# Altium PCB PS-25-001-E-01.PcbDoc (part 2 of 3)
Units mm, origin at the board's own origin, x right, y up, seen from the top; angles counter-clockwise.
Board outline 120 x 60 mm, 4 copper layers (01_Top, 02_Plane, 03_Plane, 04_Bottom), stack 1.578 mm thick; 526 components, 249 nets, 1738 pads, 748 vias.
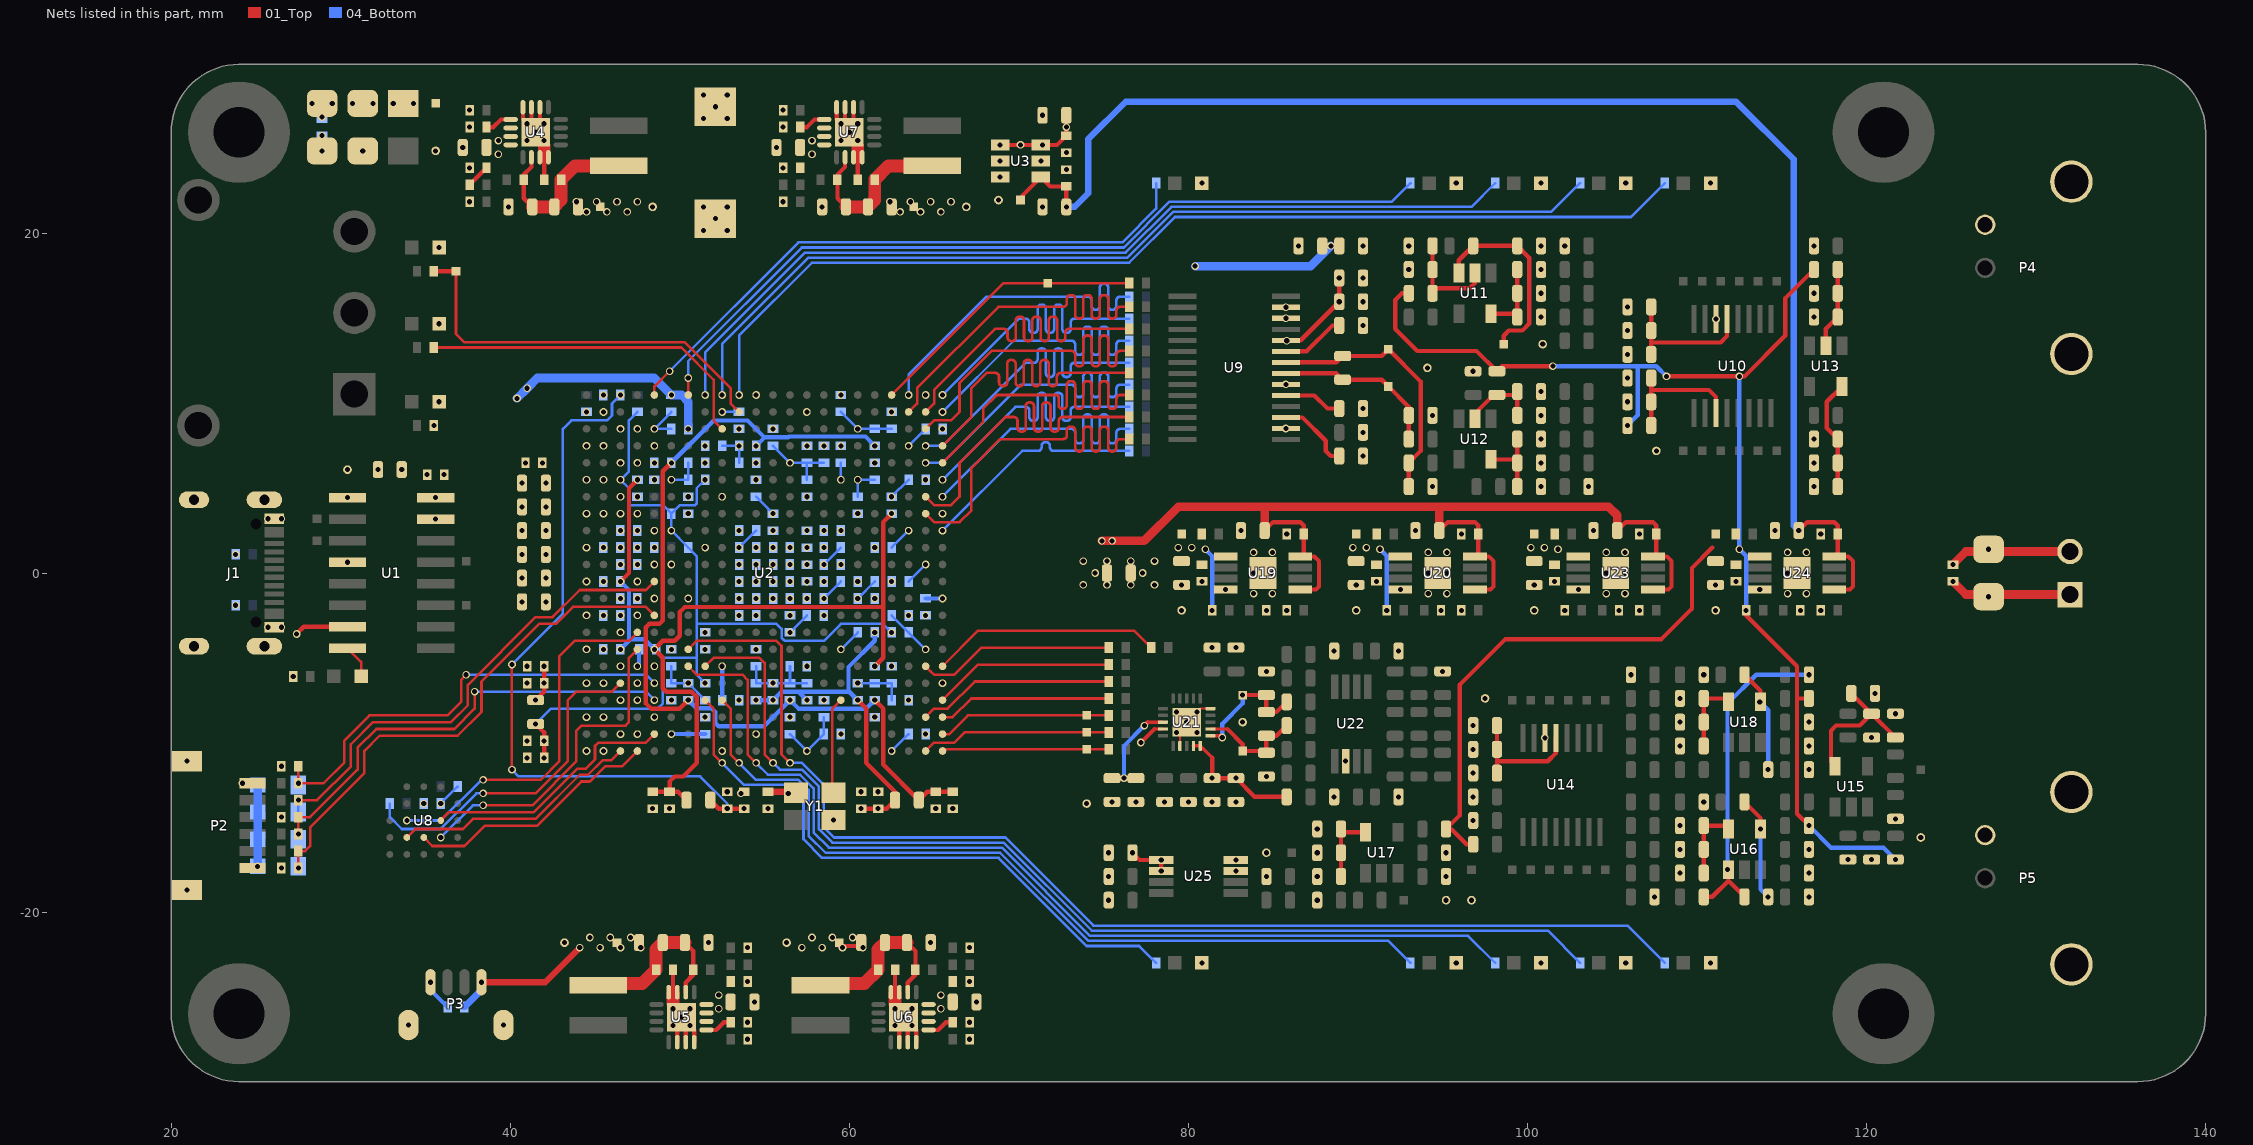
[diagram p4: the nets of this part, all layers, seen from the top]

## Part data
C1 C2 C3 C4 C5 C6 C7 C12 C13 C14 C15 C17 C35 C40 C45 C48 C49 C60 C62 C65 C67 C68 C80 C83 C85 C87 C88 C97 C100 C107 C110 C111 C113 C115 C121 C122 C123 C124 C125 C126 C127 C129 C130 C131 C132 C133 C134 C135 C136 C137 C138 C139 C140 C141 C142 C143 C144 C145 C146 C147 C148 C149 C150 C151 C152 C153 C154 C155 C156 C157 C158 C159 C160 C161 C162 C163 C164 C165 C166 C167 C168 C169 C170 C171 C172 C173 C174 C175 C176 C177 C178 C179 C180 C181 C182 C183 C184 C185 C186 C187 C188 C189 C190 C191 C192 C193 C194 C195 C196 C197 C198 C199 C200 C201 C202 C203 C204 C205 C206 C207 C208 C209 C210 C211 C212 C213 C214 C215 C216 C217 C218 C219 C220 C221 C222 C223 C224 C225 C226 C227 C228 C229 C230 C231 C232 C233 C234 C235: library part Cap, "Capacitor"
C8 C9 C10 C11 C16 C18 C19 C20 C21 C22 C23 C24 C25 C26 C27 C28 C29 C30 C31 C32 C33 C34 C36 C37 C38 C39 C41 C42 C43 C44 C46 C47 C50 C51 C52 C53 C54 C55 C56 C57 C58 C59 C61 C63 C64 C66 C69 C70 C71 C72 C73 C74 C75 C76 C77 C78 C79 C81 C82 C84 C86 C89 C90 C91 C92 C93 C94 C95 C96 C98 C99 C101 C102 C103 C104 C105 C106 C108 C109 C112 C114 C116 C117 C118 C119 C128: library part Cap_S, "Capacitor"
C120: library part "Cap Pol2", "Polarized Capacitor (Axial)"
D1 D2 D3 D4 D5 D6 D7 D8 D9 D10 D11 D12 D13 D14: library part LED0_S, "Typical INFRARED GaAs LED"
D15 D16 D17 D18: library part "D Zener_S", "Zener Diode"
F1: library part "Fuse 2_S", "Fuse"
FB1 FB2 FB3: library part Inductor, "Inductor"
J1: library part USBTypeC
L1 L2 L3 L4: library part Inductor_S, "Inductor"
P1: "Header, 2-Pin"
P2: library part 6PinConWith2Boss
P3: library part CON_4P_BOSS
P4 P5: library part BNC_TE, "BNC Elbow Connector"
R1 R2 R3 R4 R5 R6 R7 R8 R9 R10 R11 R12 R13 R14 R15 R16 R17 R18 R19 R20 R21 R22 R23 R24 R25 R26 R27 R28 R29 R30 R31 R32 R33 R34 R35 R36 R37 R38 R39 R40 R41 R42 R43 R44 R45 R46 R47 R49 R50 R55 R56 R57 R58 R59 R60 R61 R62 R63 R64 R65 R66 R67 R68 R69 R70 R71 R72 R73 R74 R75 R76 R77 R78 R79 R80 R81 R82 R83 R84 R85 R86 R87 R88 R89 R90 R91 R92 R93 R94 R95 R96 R97 R98 R99 R100 R101 R102 R103 R104 R105 R106 R107 R108 R109 R110 R111 R112 R113 R114 R115 R116 R117 R118 R119 R120 R121 R122 R123 R124 R125 R126 R127 R128 R129 R130 R131 R132 R133 R134 R135 R136 R137 R138 R139 R140 R141 R142 R143 R144 R145 R146 R147 R148 R149 R150 R151 R152 R153 R154 R155 R156 R157 R158 R159 R160 R161 R162 R163 R164: library part Res1, "Resistor"
S1: library part SW-SPDT, "SPDT Subminiature Toggle Switch, Right Angle Mounting, Vertical Actuation"
U2: library part 5CEFA7F23, "Cyclone V E Family FPGA, 1.07 to 1.13 V Supply, 240 I/O Pins, 7 PLLs, 484-Pin FBGA, Speed Grade 7, Commercial Grade, RoHS Compliant"
U3: library part LM2776
U4 U5 U6 U7: library part TLV62130RGT_S
U8: library part MT25QL128ABA8E12
U11 U12 U13 U15 U16 U17 U18: library part LM7321MF, "Op Amp"
U21: library part ADS127L21
U22: library part THS4551
U25: library part REF60xx
Y1: library part XTAL_ACTIVE

## Free pads (board coordinates)
  round 6 hole 3: 0(121,26) 2(121,-26) 3(24,-26) 4(24,26)

## Via types
v1: diameter 0.45, hole 0.3, 01_Top to 04_Bottom, tented both sides, 728 vias
v2: diameter 0.4, hole 0.3, 01_Top to 04_Bottom, tented bottom, 20 vias

## Nets (pads, with @x,y where several pads share a name; then routed paths per layer and width w, separated by ;. In a path a pad name is that pad's centre, name@x,y a point inside that pad or via, vN(x,y) a via of type N, cw(c..) or ccw(c..) an arc to the next point about the centre after c; other vN are vias at no path point)
1V1: C9.2 C11.2 C18.2 C20.2 C22.2 C24.2 C25.2 C26.2 C28.2 C30.2 C32.2 C34.2 C37.2 C39.2 C41.2 C42.2 C44.2 C47.2 C51.2 C52.2 C53.2 C55.2 C56.2 C57.2 C58.2 C59.2 C120.1 C121.2 C122.1 C123.1 C124.1 C125.1 C126.1 C127.1 R4.1 TP8.1 U2.J4 U2.J10 U2.J12 U2.J14 U2.J16 U2.K3 U2.K5 U2.K11 U2.K13 U2.K15 U2.L4 U2.L10 U2.L12 U2.L14 U2.L16 U2.M11 U2.M13 U2.M15 U2.N4 U2.N10 U2.N12 U2.N14 U2.P3 U2.P11 U2.P13 U2.P15
  other v1: 46.5,-2.5 54.5,-2.5 56.5,-2.5 58.5,-2.5 42.1,-1.7 47.5,-1.5 53.5,-1.5 55.5,-1.5 57.5,-1.5 54.5,-0.5 56.5,-0.5 58.5,-0.5 42.1,-0.3 47.5,0.5 53.5,0.5 55.5,0.5 57.5,0.5 59.5,0.5 42.1,1.1 46.5,1.5 48.5,1.5 54.5,1.5 56.5,1.5 58.5,1.5 42.1,2.5 47.5,2.5 53.5,2.5 55.5,2.5 57.5,2.5 59.5,2.5 42.1,3.9 42.1,5.3 41.9,6.5 51.4,20.2 52.8,20.2 52.1,20.9 44.5,21.3 45.7,21.3 46.9,21.3 51.4,21.6 52.8,21.6 43.9,21.9 45.1,21.9 46.3,21.9 47.5,21.9
1V8: C66.2 C69.2 C70.2 C71.2 C75.2 C77.2 C78.2 C79.2 C81.2 C82.2 C113.2 C128.1 C215.1 C216.1 P3.1 R23.1 TP11.1 U2.AA16 U2.AA21 U2.R8 U2.T11 U2.U14 U2.U19 U2.W10 U2.W15 U2.W20 U2.Y13 U21.13 Y1.4 | length 16.4
  01_Top w0.203: 77.6,-8.8 U21.13@78.5,-8.8
  01_Top w0.254: C216.1@75.5,-12.1 C215.1@76.9,-12.1 ; v1(77.4,-9) 77.6,-8.8
  01_Top w0.381: v1(38.3,-24.138) 42.063,-24.137 v1(44.1,-22.1) ; C128.1@55.2,-12.9 56.791,-12.9 Y1.4@56.86,-12.97
  04_Bottom w0.254: v1(76.2,-12.1) 76.2,-10.2 v1(77.4,-9)
  04_Bottom w0.381: C113.2@37.3,-25.6 38.3,-24.6 v1(38.3,-24.138)
  other v1: 45.3,-22.1 46.5,-22.1 47.7,-22.1 44.7,-21.5 45.9,-21.5 47.1,-21.5 56.4,-13 59.5,-9.5 64.5,-9.5 56.5,-8.5 53.5,-7.5 58.5,-7.5 63.5,-7.5 57.5,-5.5 62.5,-5.5 54.5,-4.5 51.5,-3.5
2V5: C54.2 C72.2 C73.2 C74.2 C76.2 C84.2 C86.2 C89.2 C90.2 C91.2 C92.2 C93.2 C129.1 C130.2 C133.1 C134.2 FB1.1 FB2.1 R32.1 TP13.1 U2.A3 U2.K18 U2.M17 U2.M19 U2.N18 U2.P20 U2.P21 U2.R18 U2.W11 U2.W12 U2.W14 U2.W17 | length 63.6
  01_Top w0.152: v1(40.1,-11.6) v1(40.1,-5.4)
  01_Top w0.254: FB1.1@51.8,-13.4 52.3,-13.9 v1(52.8,-13.9) v1(53.8,-13.9) ; TP13.1@59.4,-22 R32.1@60.7,-22 ; v1(60.5,-7.5) 61,-8 61,-11.2 62.7,-12.9 FB2.1@62.7,-13.4 62.2,-13.9 v1(61.7,-13.9) v1(60.7,-13.9)
  04_Bottom w0.152: v1(40.1,-11.6) 40.5,-12 51.2,-12 52.8,-13.6 v1(52.8,-13.9) ; v1(40.1,-5.4) 43.1,-2.4 43.1,8.5 43.6,9 45.7,9 46,9.3 46,10 v1(46.5,10.5)
  04_Bottom w0.254: v1(54.5,-7.5) v1(55.5,-7.5) 56,-7 57,-7 ; v1(57.5,-7.5) 57,-7 ; v1(60.5,-7.5) 60,-7 ; v1(61.5,-3.5) 61.5,-4 59.954,-5.546 59.954,-6.954 60,-7 ; 57,-7 60,-7
  other v1: 57.2,-22.1 58.4,-22.1 59.6,-22.1 60.8,-22.1 57.8,-21.5 59,-21.5 60.2,-21.5 63.5,-2.5 64.5,-2.5 61.5,-1.5 60.5,-0.5 62.5,-0.5 61.5,1.5
2V5_AUX: C27.2 C29.2 C31.2 C33.2 C36.2 C38.2 C135.1 C136.2 FB2.2 U2.D11 U2.D18 U2.E6 U2.W7 U2.W13 U2.W18 | length 54.7
  01_Top w0.254: v1(49.5,6.5) 49,6 49,-2.8 48.8,-3 48.2,-3 48,-3.2 48,-7.7 48.3,-8 50,-8 v1(50.5,-7.5) ; v1(61.5,-7.5) 62,-8 62,-11.3 FB2.2@64.1,-13.4 64.6,-12.9 C136.2@65.1,-12.9 C135.1@66.1,-12.9
  04_Bottom w0.254: v1(49.5,6.5) 52,9 54,9 55,8 ; v1(50.5,-7.5) 50.979,-7.979 51.879,-7.979 52.1,-8.2 52.1,-8.846 52.3,-9.046 54.954,-9.046 v1(56.5,-7.5) 57,-8 61,-8 v1(61.5,-7.5) ; v1(54.5,7.5) 55,8 ; v1(61.5,7.5) 60.954,8.046 56.446,8.046 56.4,8 55,8
2V5_FPLL: C8.2 C10.2 C16.2 C19.2 C21.2 C23.2 C131.1 C132.2 FB1.2 U2.F4 U2.H19 U2.M3 U2.T3 U2.T5 U2.U18 | length 50.9
  01_Top w0.254: v1(46.5,-0.5) 47,0 47,5 v1(47.5,5.5) ; C132.2@48.4,-12.9 C131.1@49.4,-12.9 ; FB1.2@50.4,-13.4 49.9,-12.9 C131.1@49.4,-12.9 ; v1(61.5,-5.5) 62,-5 62,-2 ; v1(62.5,3.5) 62,3 62,-2 ; C131.1@49.4,-12.9 49.4,-12.3 49.7,-12 50.2,-12 51,-11.2 51,-7.3 50.7,-7 49.2,-7 49,-6.8 49,-5 v1(48.5,-4.5) 49,-4 49.7,-4 50,-3.7 50,-2.3 50.3,-2 62,-2
  04_Bottom w0.254: v1(46.5,-4.5) 47,-4 ; v1(46.5,-0.5) 47,-1 47,-4 ; v1(48.5,-4.5) 47.9,-3.9 47.1,-3.9 47,-4
3V3: C4.1 C5.2 C61.2 C63.2 C64.2 C94.2 C95.2 C96.2 C98.2 C99.2 C101.2 C102.2 C103.2 C104.2 C105.2 C106.2 C108.2 C109.2 C112.2 C114.2 C116.2 C117.2 C118.2 C119.2 C137.1 C138.2 C142.2 C144.1 FB3.1 R8.2 R13.2 R44.1 TP15.1 U1.4 U1.15 U1.16 U2.A6 U2.A16 U2.B19 U2.C7 U2.C10 U2.C12 U2.C22 U2.D8 U2.D14 U2.D15 U2.D16 U2.E8 U2.E11 U2.E18 U2.F11 U2.F21 U2.G7 U2.G14 U2.H17 U2.T6 U2.W6 U2.Y8 U9.27 | length 23.5
  01_Top w0.254: v1(41.5,-7.5) 42,-7 v1(42,-6.5) v1(42,-5.5)
  04_Bottom w0.508: v1(40.4,10.3) v1(41,10.9) 41.6,11.5 48.5,11.5 v1(49.5,10.5) 50.1,10.5 50.5,10.1 v1(50.5,8.5) ; v1(80.4,18.1) 87.2,18.1 v1(88.4,19.3)
  other v1: 51.5,-8.5 49.5,-7.5 27.2,-6.1 49.5,-4.5 30.4,0.635 35.6,3.175 60.5,3.5 35.6,4.445 50.5,4.5 57.5,4.5 54.5,5.5 64.5,5.5 35.1,5.8 33.6,6.1 51.5,6.5 54.5,6.5 61.5,6.5 51.5,7.5 57.5,7.5 58.5,7.5 59.5,7.5 53.5,8.5 55.5,8.5 65.5,8.5 35.5,8.7 62.5,9.5 59.5,10.5 85.75,15.675 63,21.3 64.2,21.3 65.4,21.3 62.4,21.9 63.6,21.9 64.8,21.9 66,21.9
3V3_PGM: C43.2 C46.2 C50.2 C115.2 C139.1 C140.2 FB3.2 P2.1 R36.2 R37.2 R38.2 R41.2 R43.2 R49.1 U2.F3 U2.F8 U2.J6 U2.R19 U2.V8 U8.B4 | length 52.1
  01_Top w0.254: v1(41.5,-8.9) 42,-9.4 v1(42,-9.9) v1(42,-10.9)
  04_Bottom w0.152: v1(35.9,-13.6) R49.1@36.9,-12.6 ; v1(41.5,-8.9) 42.4,-8 48.7,-8 49,-7.7 49,-5.1 49.1,-5 51,-5 ; R38.2@47.5,9.5 47,9 47,6 v1(46.5,5.5) 47,5 47,4.1 47.1,4 49,4 R37.2@49.5,3.5 ; v1(51.5,-6.5) 51,-6 51,-5 ; v1(51.5,5.5) 51,5 51,4.1 50.9,4 50,4 R37.2@49.5,3.5 ; v1(62.5,-3.5) 62,-3 59.5,-3 58.5,-4 56.2,-4 56.128,-3.928 56.109,-3.928 56.005,-3.824 56.005,-3.305 55.7,-3 51,-3 ; R37.2@49.5,3.5 v1(49.5,2.5) R36.2@50.5,1.5 51,1 51,-3 ; 51,-5 51,-3
  other v1: 26.5,-17.4 26.5,-14.4 24.2,-12.4
5V: C1.2 C2.2 C3.2 C6.2 C7.2 C12.1 C13.2 C35.1 C40.1 C60.1 C62.1 C80.1 C83.1 C97.1 C100.1 C194.1 C195.2 C198.1 C199.2 C219.1 C220.2 F1.2 P1.1 R3.1 R9.1 R19.1 R31.1 R42.1 TP71.1 U1.7 U3.3 U3.4 U4.10 U4.11 U4.12 U5.10 U5.11 U5.12 U6.10 U6.11 U6.12 U7.10 U7.11 U7.12 U19.5 U19.8 U20.5 U20.8 U23.5 U23.8 | length 77.4
  01_Top w0.254: v1(27.4,-3.6) 27.825,-3.175 U1.7@30.4,-3.175 ; R9.1@37.6,22.9 C35.1@38.6,23.9 ; v1(68.9,25.25) v1(70.1,25.25) U3.3@71.3,25.25 v1(71.4,25.25) 72.25,25.25 C13.2@72.8,25.8 v1(72.8,26.3) C12.1@72.8,27 ; C194.1@84.5,2.5 85,3 86.6,3 86.8,2.8 C195.2@86.8,2.3 86.8,1.175 U19.8@86.6,0.975 87.425,0.975 87.7,0.7 87.7,-0.8 87.525,-0.975 U19.5@86.6,-0.975 ; C198.1@94.8,2.5 95.3,3 96.9,3 97.1,2.8 97.1,1.175 U20.8@96.9,0.975 97.725,0.975 98,0.7 98,-0.8 97.825,-0.975 U20.5@96.9,-0.975 ; C219.1@105.3,2.5 105.8,3 107.4,3 107.6,2.8 107.6,1.175 U23.8@107.4,0.975 108.225,0.975 108.5,0.7 108.5,-0.8 108.325,-0.975 U23.5@107.4,-0.975
  01_Top w0.508: v1(74.9,1.9) v1(75.5,1.9) 77.4,1.9 79.4,3.9 84.5,3.9 ; C194.1@84.5,2.5 84.5,3.9 ; C198.1@94.8,2.5 94.8,3.9 ; C219.1@105.3,2.5 105.3,3.4 104.8,3.9 94.8,3.9 ; v1(125.1,-0.5) 125.87,-1.27 P1.1@132,-1.27 ; 84.5,3.9 94.8,3.9
  other v1: 54,-27.5 67.1,-27.5 52.3,-25.7 65.4,-25.7 52.3,-24.9 65.4,-24.9 127.2,-1.4 39.3,24.7 57.8,24.7 39.3,25.5 57.8,25.5 28.9,26.9 37.6,27.3 56.1,27.3 28.3,27.7 29.5,27.7 30.7,27.7 31.9,27.7 33.1,27.7 34.3,27.7
+A2V7: C221.2 C222.1 C227.2 R57.2 R60.1 R62.1 R63.1 R104.2 R106.1 R107.1 R108.1 R109.1 R154.2 TP61.1 U23.1
  other v1: 87.6,-17.9 109,-17.7 109,-10.2 96.8,-9 121.7,-8.3 102.2,-2.2 101.8,1.4 100.2,1.5 101,1.5 100.8,5.1 116.9,5.1 100.8,15.1 105.9,15.7
-5V: C14.2 C15.1 C223.1 C224.2 TP6.1 U3.1 U24.5 U24.8 | length 83.9
  01_Top w0.254: TP6.1@70.1,22 70.1,22.15 U3.1@71.3,23.35 71.85,22.8 C14.2@72.8,22.8 v1(72.8,21.6) ; v1(116,2.5) 116.5,3 118.1,3 118.3,2.8 C224.2@118.3,2.3 118.3,1.175 U24.8@118.1,0.975 118.925,0.975 119.2,0.7 119.2,-0.8 119.025,-0.975 U24.5@118.1,-0.975
  04_Bottom w0.381: v1(72.8,21.6) 73.3,21.6 74.1,22.4 74.1,25.6 76.3,27.8 112.3,27.8 115.7,24.4 115.7,2.8 v1(116,2.5)
-A2V7: C225.2 C226.1 C228.2 R66.2 R90.1 R93.1 R94.1 R110.2 R127.1 R129.1 R130.1 R132.1 R155.2 TP62.1 U24.1 | length 101.7
  01_Top w0.254: R90.1@93,16.5 92.6,16.5 92.2,16.1 92.2,14.4 93.5,13.1 97,13.1 R93.1@98.2,11.9 98.5,12.2 v1(101.5,12.2) ; R110.2@96.8,-16 96.4,-16 95.5,-15.1 R130.1@95.2,-15.1 96,-14.3 96,-6.6 98.7,-3.9 107.9,-3.9 109.7,-2.1 109.7,0.3 110.9,1.5 ; v1(108.2,11.6) v1(112.5,11.6) 112.8,11.6 115.2,14 115.2,16.2 R94.1@116.9,17.9 ; v1(112.9,-2.2) 112.9,-2.5 115.9,-5.5 115.9,-7.4 ; v1(116.6,-14.9) 115.9,-14.2 115.9,-7.4 ; R132.1@116.6,-7.4 115.9,-7.4
  04_Bottom w0.254: v1(101.5,12.2) 106.5,12.2 ; v1(105.9,8.7) 106.5,9.3 106.5,12.2 ; v1(108.2,11.6) 107.6,12.2 106.5,12.2 ; v1(112.5,11.6) v1(112.5,1.4) 112.9,1 v1(112.9,-2.2) ; v1(116.6,-14.9) 117.9,-16.2 121,-16.2 v1(121.7,-16.9)
A3V3: C141.1 C143.2 C148.1 C196.2 C197.1 C202.2 R140.2 TP54.1 U9.24 U19.1 | length 9.3
  01_Top w0.254: U9.24@85.75,13.725 86.625,13.725 v1(88.9,16) v1(88.9,17.4)
  04_Bottom w0.254: v1(81,1.4) 81.4,1 v1(81.4,-2.2)
  other v1: 79.4,1.5 80.2,1.5 90.3,9.7 85.8,13.7
A4V5: C200.2 C201.1 C203.2 C208.1 C209.1 C234.1 R134.1 R141.2 TP55.1 U20.1 U21.19 U21.20 U25.1 U25.2 | length 13.7
  01_Top w0.203: U21.19@80.3,-10.2 U21.20@80.7,-10.2 81.4,-10.9
  01_Top w0.254: v1(76.7,-16.5) 77.125,-16.925 v1(78.4,-16.925) v1(78.4,-17.575) ; 81.4,-10.9 v1(81.4,-12.1) v1(82.8,-12.1) 83.9,-13.2 R134.1@85.8,-13.2
  04_Bottom w0.254: v1(91.3,1.4) 91.7,1 v1(91.7,-2.2)
  other v1: 89.7,1.5 90.5,1.5
AD_CLK: R151.1 TP64.1 U2.AB21 | length 11.3
  01_Top w0.152: U2.AB21@64.5,-10.5 65,-10 66.2,-10 66.8,-9.4 TP64.1@74,-9.4 R151.1@75.3,-9.4
AD_CS: R160.1 U2.U21 | length 11.7
  01_Top w0.152: U2.U21@64.5,-5.5 64.8,-5.8 65,-6 66.2,-6 67.8,-4.4 R160.1@75.3,-4.4
AD_DRDY: R152.1 TP65.1 U2.AA22 | length 10.3
  01_Top w0.152: U2.AA22@65.5,-9.5 65.9,-9.5 67,-8.4 TP65.1@74,-8.4 R152.1@75.3,-8.4
AD_N: C207.2 C210.1 R145.2 TP57.1 U21.2 | length 6.6
  01_Top w0.203: U21.2@81.3,-9.2 82.3,-9.2
  01_Top w0.254: 82.3,-9.2 83.2,-10.1 TP57.1@83.2,-10.5 84.5,-10.5 C210.1@84.6,-10.6 C207.2@84.6,-9.6 85.2,-9.6 R145.2@85.8,-9
AD_P: C193.2 C207.1 R139.2 TP56.1 U21.1 | length 7.6
  01_Top w0.203: U21.1@81.3,-9.6 v1@81.9,-9.6
  01_Top w0.254: v1@81.9,-9.6 v1(82,-9.7) ; v1(83.2,-7.2) C193.2@84.6,-7.2 C207.1@84.6,-8.2 85.2,-8.2 R139.2@85.8,-7.6
  04_Bottom w0.254: v1(82,-9.7) 82,-8.9 83.2,-7.7 v1(83.2,-7.2)
AD_RST: R161.1 U2.U22 | length 13.6
  01_Top w0.152: U2.U22@65.5,-5.5 67.6,-3.4 76.8,-3.4 R161.1@77.8,-4.4
AD_SCLK: R156.1 U2.Y21 | length 11.7
  01_Top w0.152: U2.Y21@64.5,-8.5 65,-8 65.8,-8 67.4,-6.4 R156.1@75.3,-6.4
AD_SDI: R157.1 U2.W22 | length 10.7
  01_Top w0.152: U2.W22@65.5,-7.5 67.6,-5.4 R157.1@75.3,-5.4
AD_SDO: R153.1 U2.Y22 | length 10.3
  01_Top w0.152: U2.Y22@65.5,-8.5 66.1,-8.5 67.2,-7.4 R153.1@75.3,-7.4
AD_START: R150.1 TP63.1 U2.AB22 | length 9.8
  01_Top w0.152: U2.AB22@65.5,-10.5 65.6,-10.4 TP63.1@74,-10.4 R150.1@75.3,-10.4
AGND: C141.2 C143.1 C145.2 C146.2 C147.1 C149.2 C150.2 C151.1 C152.1 C153.1 C154.1 C155.2 C156.1 C157.2 C159.1 C160.1 C161.1 C162.2 C163.2 C164.2 C165.2 C168.2 C169.2 C170.1 C171.2 C172.2 C173.1 C174.2 C175.1 C176.1 C177.1 C178.2 C179.1 C180.1 C181.2 C182.1 C183.1 C184.1 C185.1 C186.2 C187.1 C188.2 C189.2 C190.2 C191.2 C192.2 C193.1 C194.2 C195.1 C196.1 C197.2 C198.2 C199.1 C200.1 C201.2 C208.2 C209.2 C210.2 C211.1 C212.1 C213.2 C214.2 C217.1 C218.1 C219.2 C220.1 C221.1 C222.2 C223.2 C224.1 C225.1 C226.2 C229.2 C230.2 C231.1 C232.1 C233.2 C234.2 C235.2 P4.2 P4.3 P4.4 P5.2 P5.3 P5.4 R77.2 R80.1 R86.2 R87.2 R88.2 R89.2 R98.2 R113.2 R121.2 R124.2 R125.2 R131.2 R135.1 R142.1 R143.1 R158.1 R159.1 R163.1 R164.1 TP34.1 TP35.1 TP36.1 TP51.1 TP52.1 TP53.1 TP58.1 TP59.1 TP60.1 TP67.1 TP68.1 TP70.1 TP73.1 U9.16 U9.20 U10.14 U14.14 U19.4 U19.9 U20.4 U20.9 U21.5 U21.17 U21.21 U22.6 U23.4 U23.9 U24.4 U24.9 U25.7 U25.8 | length 2.4
  01_Top w0.127: U21.17@79.5,-10.2 79.5,-9.2 v1(79.9,-8.8) ; v1(80.5,-8.2) 80.7,-8 U21.5@81.3,-8
  other v1: 75.3,-19.3 87.6,-19.3 95.2,-19.3 96.7,-19.3 107.5,-19.1 116.6,-19.1 75.3,-17.9 84.6,-17.9 95.2,-17.9 116.6,-17.7 82.8,-17.575 82.8,-16.925 118.9,-16.9 120.3,-16.9 75.3,-16.5 84.6,-16.5 87.6,-16.5 95.2,-16.5 109,-16.3 116.6,-16.3 123.2,-15.6 87.6,-15.1 109,-14.9 96.8,-14.6 121.7,-14.5 78.6,-13.5 80,-13.5 81.4,-13.5 82.8,-13.5 110.4,-13.5 88.6,-13.2 92.4,-13.2 96.8,-13.2 84.6,-12 96.8,-11.8 116.6,-11.6 89.275,-11.1 96.8,-10.4 116.6,-10.2 101.025,-9.725 120.3,-9.7 79.3,-9.4 80.5,-9.4 83.2,-8.8 109,-8.8 116.6,-8.8 79.3,-8.2 97.5,-7.4 109,-7.4 120.5,-7.1 106.1,-6 110.4,-6 84.6,-5.8 95,-5.8 88.6,-4.6 92.4,-4.6 81.4,-4.4 82.8,-4.4 79.6,-2.2 84.6,-2.2 85.8,-2.2 89.9,-2.2 94.9,-2.2 96.1,-2.2 100.4,-2.2 105.4,-2.2 106.6,-2.2 111.1,-2.2 116.1,-2.2 117.3,-2.2 83.85,-1.22 84.95,-1.22 94.15,-1.22 95.25,-1.22 104.65,-1.22 105.75,-1.22 115.35,-1.22 116.45,-1.22 82.2,-0.975 92.5,-0.975 103,-0.975 113.7,-0.975 76.6,-0.7 78,-0.7 79.6,-0.7 89.9,-0.7 100.4,-0.7 111.1,-0.7 80.8,-0.5 91.1,-0.5 101.6,-0.5 112.3,-0.5 77.3,0 83.85,0 84.95,0 94.15,0 95.25,0 104.65,0 105.75,0 115.35,0 116.45,0 76.6,0.7 78,0.7 83.85,1.22 84.95,1.22 94.15,1.22 95.25,1.22 104.65,1.22 105.75,1.22 115.35,1.22 116.45,1.22 85.8,2.3 96.1,2.3 106.6,2.3 117.3,2.3 83.1,2.5 93.4,2.5 103.9,2.5 114.6,2.5 94.4,5.1 103.6,5.1 100.8,6.5 116.9,6.5 90.3,6.9 107.6,7.2 100.8,7.9 116.9,7.9 90.3,8.3 85.75,8.525 94.4,9.3 100.8,9.3 105.9,10.1 100.8,10.7 85.75,11.125 105.9,11.5 96.8,11.9 94.1,12.1 105.9,12.9 100.9,13.5 105.9,14.3 90.3,14.6 111.125,14.975 116.9,15.1 90.3,16 100.8,16.5 116.9,16.5 90.3,17.4 93,17.9 100.8,17.9 93,19.3 100.8,19.3 102.2,19.3 116.9,19.3
AS_ASDO: U2.AB4 U8.D3 | length 15.1
  01_Top w0.152: U8.D3@34.9,-15.6 35.4,-16.1 37.3,-16.1 38.5,-14.9 41.6,-14.9 44.2,-12.3 44.7,-12.3 45.6,-11.4 46.6,-11.4 U2.AB4@47.5,-10.5
AS_DATA1: U2.AB3 U8.D2 | length 14.7
  01_Top w0.152: U8.D2@33.9,-15.6 34.4,-15.1 37.2,-15.1 37.8,-14.5 41.5,-14.5 44.1,-11.9 44.6,-11.9 45.45,-11.05 45.95,-11.05 U2.AB3@46.5,-10.5
AS_DATA2: U2.AA5 U8.C4 | length 15.2
  01_Top w0.152: U8.C4@35.9,-14.6 36.4,-14.1 38.23,-14.1 38.233,-14.103 41.397,-14.103 43.95,-11.55 44.45,-11.55 45,-11 45,-10.2 45.2,-10 48,-10 U2.AA5@48.5,-9.5
AS_DATA3: U2.T4 U8.D4 | length 19.5
  01_Top w0.152: v1(38.4,-13.7) 41.3,-13.7 43.9,-11.1 43.9,-9.3 44.2,-9 46.8,-9 47,-8.8 47,-5 U2.T4@47.5,-4.5
  04_Bottom w0.152: v1(35.9,-15.6) 37.8,-13.7 v1(38.4,-13.7)
AS_DCLK: R47.1 U2.V3 | length 20.4
  01_Top w0.152: v1(38.4,-13) 41.5,-13 43.4,-11.1 43.4,-7.5 43.9,-7 46,-7 U2.V3@46.5,-6.5
  04_Bottom w0.152: R47.1@32.9,-13.6 32.9,-14.4 33.6,-15.1 35.9,-15.1 38,-13 v1(38.4,-13)
AS_NCSO0: U2.R4 U8.C2 | length 21.8
  01_Top w0.152: v1(38.4,-12.2) 41.8,-12.2 42.9,-11.1 42.9,-4.9 43.8,-4 47,-4 U2.R4@47.5,-3.5
  04_Bottom w0.152: v1(33.9,-14.6) 35.9,-14.6 38.3,-12.2 v1(38.4,-12.2)
DA_CLK: R64.2 TP22.1 U2.A19 | length 16.7
  01_Top w0.152: U2.A19@62.5,10.5 69.1,17.1 75.3,17.1 R64.2@76.5,17.1
DA_D0: R65.2 U2.H21 | length 23.1
  01_Top w0.152: U2.H21@64.5,3.5 65,3 66.5,3 67.2,3.7 67.2,6.2 68.9,7.9 72.6,7.9 72.612,7.9 ccw(c72.612,8.119) 72.832,8.119 72.832,8.411 cw(c73.051,8.411) 73.051,8.631 73.1,8.631 cw(c73.1,8.411) 73.319,8.411 73.319,7.9 73.319,7.389 ccw(c73.538,7.389) 73.538,7.169 73.587,7.169 ccw(c73.587,7.389) 73.806,7.389 73.806,7.9 73.806,8.411 cw(c74.026,8.411) 74.026,8.631 74.075,8.631 cw(c74.075,8.411) 74.294,8.411 74.294,7.9 74.294,7.389 ccw(c74.513,7.389) 74.513,7.169 74.562,7.169 ccw(c74.562,7.389) 74.781,7.389 74.781,7.9 74.781,8.411 cw(c75.001,8.411) 75.001,8.631 75.049,8.631 cw(c75.049,8.411) 75.269,8.411 75.269,7.9 75.269,7.389 ccw(c75.488,7.389) 75.488,7.169 75.537,7.169 ccw(c75.537,7.389) 75.756,7.389 75.756,7.681 cw(c75.976,7.681) 75.976,7.9 76,7.9 R65.2@76.5,7.9
DA_D1: R67.2 U2.G22 | length 20
  04_Bottom w0.152: v1(65.5,4.5) 69.5,8.5 73,8.5 73.1,8.5 cw(c73.1,8.281) 73.319,8.281 73.319,7.869 ccw(c73.538,7.869) 73.538,7.649 73.587,7.649 ccw(c73.587,7.869) 73.806,7.869 73.806,8.5 73.806,9.131 cw(c74.026,9.131) 74.026,9.351 74.075,9.351 cw(c74.075,9.131) 74.294,9.131 74.294,8.5 74.294,7.869 ccw(c74.513,7.869) 74.513,7.649 74.562,7.649 ccw(c74.562,7.869) 74.781,7.869 74.781,8.5 74.781,9.131 cw(c75.001,9.131) 75.001,9.351 75.049,9.351 cw(c75.049,9.131) 75.269,9.131 75.269,8.5 75.269,7.869 ccw(c75.488,7.869) 75.488,7.649 75.537,7.649 ccw(c75.537,7.869) 75.756,7.869 75.756,8.281 cw(c75.976,8.281) 75.976,8.5 76,8.5 R67.2@76.5,8.5
DA_D2: R68.2 U2.G21 | length 23
  01_Top w0.152: U2.G21@64.5,4.5 65,4 66,4 66.5,4.5 66.5,6.5 69.2,9.2 69.432,9.2 69.7,9.2 cw(c69.7,8.981) 69.919,8.981 69.919,8.559 ccw(c70.138,8.559) 70.138,8.339 70.187,8.339 ccw(c70.187,8.559) 70.406,8.559 70.406,9.2 70.406,9.841 cw(c70.626,9.841) 70.626,10.061 70.675,10.061 cw(c70.675,9.841) 70.894,9.841 70.894,9.2 70.894,8.559 ccw(c71.113,8.559) 71.113,8.339 71.162,8.339 ccw(c71.162,8.559) 71.381,8.559 71.381,9.2 71.381,9.841 cw(c71.601,9.841) 71.601,10.061 71.649,10.061 cw(c71.649,9.841) 71.869,9.841 71.869,9.2 71.869,8.559 ccw(c72.088,8.559) 72.088,8.339 72.137,8.339 ccw(c72.137,8.559) 72.356,8.559 72.356,8.981 cw(c72.576,8.981) 72.576,9.2 72.6,9.2 R68.2@76.5,9.2
DA_D3: R70.2 U2.F22 | length 19.9
  04_Bottom w0.152: v1(65.5,5.5) 69.8,9.8 70.3,9.8 70.4,9.8 cw(c70.4,9.581) 70.619,9.581 70.619,9.199 ccw(c70.838,9.199) 70.838,8.979 70.887,8.979 ccw(c70.887,9.199) 71.106,9.199 71.106,9.8 71.106,10.401 cw(c71.326,10.401) 71.326,10.621 71.375,10.621 cw(c71.375,10.401) 71.594,10.401 71.594,9.8 71.594,9.199 ccw(c71.813,9.199) 71.813,8.979 71.862,8.979 ccw(c71.862,9.199) 72.081,9.199 72.081,9.8 72.081,10.401 cw(c72.301,10.401) 72.301,10.621 72.349,10.621 cw(c72.349,10.401) 72.569,10.401 72.569,9.8 72.569,9.199 ccw(c72.788,9.199) 72.788,8.979 72.837,8.979 ccw(c72.837,9.199) 73.056,9.199 73.056,9.581 cw(c73.276,9.581) 73.276,9.8 73.3,9.8 R70.2@76.5,9.8
DA_D4: R71.2 U2.E22 | length 23.1
  01_Top w0.152: U2.E22@65.5,6.5 67.9,8.9 67.9,9.7 68.7,10.5 72.2,10.5 cw(c72.2,10.356) 72.344,10.356 72.344,9.899 ccw(c72.563,9.899) 72.563,9.679 72.612,9.679 ccw(c72.612,9.899) 72.832,9.899 72.832,10.5 72.832,11.101 cw(c73.051,11.101) 73.051,11.321 73.1,11.321 cw(c73.1,11.101) 73.319,11.101 73.319,10.5 73.319,9.899 ccw(c73.538,9.899) 73.538,9.679 73.587,9.679 ccw(c73.587,9.899) 73.806,9.899 73.806,10.5 73.806,11.101 cw(c74.026,11.101) 74.026,11.321 74.075,11.321 cw(c74.075,11.101) 74.294,11.101 74.294,10.5 74.294,9.899 ccw(c74.513,9.899) 74.513,9.679 74.562,9.679 ccw(c74.562,9.899) 74.781,9.899 74.781,10.5 74.781,11.101 cw(c75.001,11.101) 75.001,11.321 75.049,11.321 cw(c75.049,11.101) 75.269,11.101 75.269,10.5 75.269,9.899 ccw(c75.488,9.899) 75.488,9.679 75.537,9.679 ccw(c75.537,9.899) 75.756,9.899 75.756,10.281 cw(c75.976,10.281) 75.976,10.5 76,10.5 R71.2@76.5,10.5
DA_D5: R75.2 U2.E21 | length 20
  04_Bottom w0.152: v1(64.5,6.5) 65.5,6.5 70.1,11.1 73,11.1 73.1,11.1 cw(c73.1,10.881) 73.319,10.881 73.319,10.599 ccw(c73.538,10.599) 73.538,10.379 73.587,10.379 ccw(c73.587,10.599) 73.806,10.599 73.806,11.1 73.806,11.601 cw(c74.026,11.601) 74.026,11.821 74.075,11.821 cw(c74.075,11.601) 74.294,11.601 74.294,11.1 74.294,10.599 ccw(c74.513,10.599) 74.513,10.379 74.562,10.379 ccw(c74.562,10.599) 74.781,10.599 74.781,11.1 74.781,11.601 cw(c75.001,11.601) 75.001,11.821 75.049,11.821 cw(c75.049,11.601) 75.269,11.601 75.269,11.1 75.269,10.599 ccw(c75.488,10.599) 75.488,10.379 75.537,10.379 ccw(c75.537,10.599) 75.756,10.599 75.756,10.881 cw(c75.976,10.881) 75.976,11.1 76,11.1 R75.2@76.5,11.1
DA_D6: R78.2 U2.D22 | length 23.1
  01_Top w0.152: U2.D22@65.5,7.5 67.2,9.2 67.2,10.9 68.1,11.8 68.344,11.8 68.612,11.8 cw(c68.612,11.581) 68.831,11.581 68.831,11.249 ccw(c69.051,11.249) 69.051,11.029 69.099,11.029 ccw(c69.099,11.249) 69.319,11.249 69.319,11.8 69.319,12.351 cw(c69.538,12.351) 69.538,12.571 69.587,12.571 cw(c69.587,12.351) 69.806,12.351 69.806,11.8 69.806,11.249 ccw(c70.025,11.249) 70.025,11.029 70.074,11.029 ccw(c70.074,11.249) 70.294,11.249 70.294,11.8 70.294,12.351 cw(c70.513,12.351) 70.513,12.571 70.562,12.571 cw(c70.562,12.351) 70.781,12.351 70.781,11.8 70.781,11.249 ccw(c71,11.249) 71,11.029 71.049,11.029 ccw(c71.049,11.249) 71.268,11.249 71.268,11.8 71.268,12.351 cw(c71.488,12.351) 71.488,12.571 71.537,12.571 cw(c71.537,12.351) 71.756,12.351 71.756,11.8 71.756,11.249 ccw(c71.975,11.249) 71.975,11.029 72.024,11.029 ccw(c72.024,11.249) 72.243,11.249 72.243,11.581 cw(c72.463,11.581) 72.463,11.8 72.7,11.8 73.8,11.8 R78.2@76.5,11.8
DA_D7: R81.2 U2.D21 | length 19.8
  04_Bottom w0.152: v1(64.5,7.5) 65.5,7.5 70.4,12.4 70.7,12.4 70.887,12.4 ccw(c70.887,12.619) 71.106,12.619 71.106,13.021 cw(c71.326,13.021) 71.326,13.241 71.375,13.241 cw(c71.375,13.021) 71.594,13.021 71.594,12.4 71.594,11.779 ccw(c71.813,11.779) 71.813,11.559 71.862,11.559 ccw(c71.862,11.779) 72.081,11.779 72.081,12.4 72.081,13.021 cw(c72.301,13.021) 72.301,13.241 72.349,13.241 cw(c72.349,13.021) 72.569,13.021 72.569,12.4 72.569,11.779 ccw(c72.788,11.779) 72.788,11.559 72.837,11.559 ccw(c72.837,11.779) 73.056,11.779 73.056,12.181 cw(c73.276,12.181) 73.276,12.4 73.3,12.4 R81.2@76.5,12.4
DA_D8: R84.2 U2.C21 | length 22.9
  01_Top w0.152: U2.C21@64.5,8.5 65,9 66,9 66.5,9.5 66.5,11.2 68.4,13.1 72.9,13.1 73.1,13.1 cw(c73.1,12.881) 73.319,12.881 73.319,12.409 ccw(c73.538,12.409) 73.538,12.189 73.587,12.189 ccw(c73.587,12.409) 73.806,12.409 73.806,13.1 73.806,13.791 cw(c74.026,13.791) 74.026,14.011 74.075,14.011 cw(c74.075,13.791) 74.294,13.791 74.294,13.1 74.294,12.409 ccw(c74.513,12.409) 74.513,12.189 74.562,12.189 ccw(c74.562,12.409) 74.781,12.409 74.781,13.1 74.781,13.791 cw(c75.001,13.791) 75.001,14.011 75.049,14.011 cw(c75.049,13.791) 75.269,13.791 75.269,13.1 75.269,12.409 ccw(c75.488,12.409) 75.488,12.189 75.537,12.189 ccw(c75.537,12.409) 75.756,12.409 75.756,12.881 cw(c75.976,12.881) 75.976,13.1 76,13.1 R84.2@76.5,13.1
DA_D9: R91.2 U2.B22 | length 19.9
  04_Bottom w0.152: v1(65.5,9.5) 69.7,13.7 73,13.7 73.1,13.7 cw(c73.1,13.481) 73.319,13.481 73.319,13.089 ccw(c73.538,13.089) 73.538,12.869 73.587,12.869 ccw(c73.587,13.089) 73.806,13.089 73.806,13.7 73.806,14.311 cw(c74.026,14.311) 74.026,14.531 74.075,14.531 cw(c74.075,14.311) 74.294,14.311 74.294,13.7 74.294,13.089 ccw(c74.513,13.089) 74.513,12.869 74.562,12.869 ccw(c74.562,13.089) 74.781,13.089 74.781,13.7 74.781,14.311 cw(c75.001,14.311) 75.001,14.531 75.049,14.531 cw(c75.049,14.311) 75.269,14.311 75.269,13.7 75.269,13.089 ccw(c75.488,13.089) 75.488,12.869 75.537,12.869 ccw(c75.537,13.089) 75.756,13.089 75.756,13.481 cw(c75.976,13.481) 75.976,13.7 76,13.7 R91.2@76.5,13.7
DA_D10: R95.2 U2.B21 | length 23.1
  01_Top w0.152: U2.B21@64.5,9.5 65,10 65,10.8 68.6,14.4 68.844,14.4 69.112,14.4 cw(c69.112,14.181) 69.331,14.181 69.331,13.899 ccw(c69.551,13.899) 69.551,13.679 69.599,13.679 ccw(c69.599,13.899) 69.819,13.899 69.819,14.4 69.819,14.901 cw(c70.038,14.901) 70.038,15.121 70.087,15.121 cw(c70.087,14.901) 70.306,14.901 70.306,14.4 70.306,13.899 ccw(c70.525,13.899) 70.525,13.679 70.574,13.679 ccw(c70.574,13.899) 70.794,13.899 70.794,14.4 70.794,14.901 cw(c71.013,14.901) 71.013,15.121 71.062,15.121 cw(c71.062,14.901) 71.281,14.901 71.281,14.4 71.281,13.899 ccw(c71.5,13.899) 71.5,13.679 71.549,13.679 ccw(c71.549,13.899) 71.768,13.899 71.768,14.4 71.768,14.901 cw(c71.988,14.901) 71.988,15.121 72.037,15.121 cw(c72.037,14.901) 72.256,14.901 72.256,14.4 72.256,13.899 ccw(c72.475,13.899) 72.475,13.679 72.524,13.679 ccw(c72.524,13.899) 72.743,13.899 72.743,14.181 cw(c72.963,14.181) 72.963,14.4 73.2,14.4 R95.2@76.5,14.4
DA_D11: R97.2 U2.A22 | length 20
  04_Bottom w0.152: v1(65.5,10.5) 70,15 70.2,15 70.4,15 cw(c70.4,14.781) 70.619,14.781 70.619,14.389 ccw(c70.838,14.389) 70.838,14.169 70.887,14.169 ccw(c70.887,14.389) 71.106,14.389 71.106,15 71.106,15.611 cw(c71.326,15.611) 71.326,15.831 71.375,15.831 cw(c71.375,15.611) 71.594,15.611 71.594,15 71.594,14.389 ccw(c71.813,14.389) 71.813,14.169 71.862,14.169 ccw(c71.862,14.389) 72.081,14.389 72.081,15 72.081,15.611 cw(c72.301,15.611) 72.301,15.831 72.349,15.831 cw(c72.349,15.611) 72.569,15.611 72.569,15 72.569,14.389 ccw(c72.788,14.389) 72.788,14.169 72.837,14.169 ccw(c72.837,14.389) 73.056,14.389 73.056,14.781 cw(c73.276,14.781) 73.276,15 73.3,15 R97.2@76.5,15
DA_D12: R99.2 U2.B20 | length 23.1
  01_Top w0.152: U2.B20@63.5,9.5 64,10 64,10.9 68.8,15.7 72.5,15.7 72.612,15.7 ccw(c72.612,15.919) 72.832,15.919 72.832,16.171 cw(c73.051,16.171) 73.051,16.391 73.1,16.391 cw(c73.1,16.171) 73.319,16.171 73.319,15.7 73.319,15.229 ccw(c73.538,15.229) 73.538,15.009 73.587,15.009 ccw(c73.587,15.229) 73.806,15.229 73.806,15.7 73.806,16.171 cw(c74.026,16.171) 74.026,16.391 74.075,16.391 cw(c74.075,16.171) 74.294,16.171 74.294,15.7 74.294,15.229 ccw(c74.513,15.229) 74.513,15.009 74.562,15.009 ccw(c74.562,15.229) 74.781,15.229 74.781,15.7 74.781,16.171 cw(c75.001,16.171) 75.001,16.391 75.049,16.391 cw(c75.049,16.171) 75.269,16.171 75.269,15.7 75.269,15.229 ccw(c75.488,15.229) 75.488,15.009 75.537,15.009 ccw(c75.537,15.229) 75.756,15.229 75.756,15.481 cw(c75.976,15.481) 75.976,15.7 76,15.7 R99.2@76.5,15.7
DA_D13: R100.2 U2.A20 | length 20
  04_Bottom w0.152: v1(63.5,10.5) 63.5,11.7 68.1,16.3 74,16.3 74.075,16.3 cw(c74.075,16.081) 74.294,16.081 74.294,15.749 ccw(c74.513,15.749) 74.513,15.529 74.562,15.529 ccw(c74.562,15.749) 74.781,15.749 74.781,16.3 74.781,16.851 cw(c75.001,16.851) 75.001,17.071 75.049,17.071 cw(c75.049,16.851) 75.269,16.851 75.269,16.3 75.269,15.749 ccw(c75.488,15.749) 75.488,15.529 75.537,15.529 ccw(c75.537,15.749) 75.756,15.749 75.756,16.081 cw(c75.976,16.081) 75.976,16.3 76,16.3 R100.2@76.5,16.3
DA_N: C158.2 R74.1 R88.1 TP32.1 U9.21 | length 10
  01_Top w0.254: U9.21@85.75,11.775 88.725,11.775 C158.2@89.1,11.4 91.4,11.4 TP32.1@91.8,11 93,9.8 R88.1@93,9.3 R74.1@93,7.9
DA_P: C158.1 R69.1 R89.1 TP33.1 U9.22 | length 15.5
  01_Top w0.254: U9.22@85.75,12.425 88.725,12.425 C158.1@89.1,12.8 91.4,12.8 TP33.1@91.8,13.2 93.7,11.3 93.7,7.2 R69.1@93,6.5 R89.1@93,5.1
DA_PD: R61.2 U2.J22 | length 13.6
  04_Bottom w0.152: v1(65.5,2.5) 70.2,7.2 71.1,7.2 71.124,7.2 ccw(c71.124,7.419) 71.344,7.419 71.344,7.501 cw(c71.563,7.501) 71.563,7.721 71.612,7.721 cw(c71.612,7.501) 71.831,7.501 71.831,7.419 ccw(c72.051,7.419) 72.051,7.2 72.1,7.2 R61.2@76.5,7.2
GND: C1.1 C2.1 C3.1 C4.2 C5.1 C6.1 C7.1 C8.1 C9.1 C10.1 C11.1 C12.2 C13.1 C14.1 C15.2 C16.1 C18.1 C19.1 C20.1 C21.1 C22.1 C23.1 C24.1 C25.1 C26.1 C27.1 C28.1 C29.1 C30.1 C31.1 C32.1 C33.1 C34.1 C35.2 C36.1 C37.1 C38.1 C39.1 C40.2 C41.1 C42.1 C43.1 C44.1 C45.2 C46.1 C47.1 C48.2 C49.1 C50.1 C51.1 C52.1 C53.1 C54.1 C55.1 C56.1 C57.1 C58.1 C59.1 C60.2 C61.1 C62.2 C63.1 C64.1 C65.2 C66.1 C67.2 C68.1 C69.1 C70.1 C71.1 C72.1 C73.1 C74.1 C75.1 C76.1 C77.1 C78.1 C79.1 C80.2 C81.1 C82.1 C83.2 C84.1 C85.2 C86.1 C87.2 C88.1 C89.1 C90.1 C91.1 C92.1 C93.1 C94.1 C95.1 C96.1 C97.2 C98.1 C99.1 C100.2 C101.1 C102.1 C103.1 C104.1 C105.1 C106.1 C107.2 C108.1 C109.1 C110.2 C111.1 C112.1 C113.1 C114.1 C115.1 C116.1 C117.1 C118.1 C119.1 C120.2 C121.1 C122.2 C123.2 C124.2 C125.2 C126.2 C127.2 C128.2 C129.2 C130.1 C131.2 C132.1 C133.2 C134.1 C135.2 C136.1 C137.2 C138.1 C139.2 C140.1 C142.1 C144.2 C215.2 C216.2 D1.2 D2.2 D3.2 D4.2 D5.2 D7.2 D8.2 D9.2 D10.2 D11.2 D12.2 D13.2 D14.2 D15.1 D16.1 D17.1 D18.1 J1.1 J1.2 J1.3 J1.4 J1.A1 J1.A12 J1.B1 J1.B12 P1.2 P2.6 P2.7 P2.8 P3.4 P3.5 P3.6 R1.2 R2.1 R12.1 R26.1 R35.1 R39.2 R40.2 R50.1 R55.1 R164.2 TP3.1 TP7.1 TP9.1 TP12.1 TP14.1 TP16.1 TP69.1 TP72.1 U1.1 U2.A2 U2.A11 U2.A21 U2.AA3 U2.AA4 U2.AA6 U2.AA11 U2.AB1 U2.AB2 U2.AB9 U2.AB14 U2.AB19 U2.B1 U2.B2 U2.B9 U2.B14 U2.C3 U2.C4 U2.C5 U2.C17 U2.D1 U2.D2 U2.D5 U2.D10 U2.D20 U2.E3 U2.E4 U2.E5 U2.E13 U2.F1 U2.F2 U2.F5 U2.F6 U2.F16 U2.F17 U2.G3 U2.G4 U2.G9 U2.G19 U2.H1 U2.H2 U2.H3 U2.H4 U2.H7 U2.H12 U2.H22 U2.J3 U2.J5 U2.J15 U2.J20 U2.K1 U2.K2 U2.K4 U2.K8 U2.K10 U2.K12 U2.K14 U2.L3 U2.L5 U2.L6 U2.L11 U2.L13 U2.L15 U2.L21 U2.M1 U2.M2 U2.M4 U2.M10 U2.M12 U2.M14 U2.N3 U2.N5 U2.N7 U2.N11 U2.N13 U2.N15 U2.N17 U2.N22 U2.P1 U2.P2 U2.P4 U2.P10 U2.R3 U2.R13 U2.T1 U2.T2 U2.T8 U2.T16 U2.T21 U2.U3 U2.U4 U2.U5 U2.U9 U2.V1 U2.V2 U2.V4 U2.V7 U2.V12 U2.V17 U2.V22 U2.W3 U2.W4 U2.Y1 U2.Y2 U2.Y5 U2.Y18 U3.2 U4.6 U4.7 U4.8 U4.15 U4.16 U4.17 U5.6 U5.7 U5.8 U5.15 U5.16 U5.17 U6.6 U6.7 U6.8 U6.15 U6.16 U6.17 U7.6 U7.7 U7.8 U7.15 U7.16 U7.17 U8.B3 U9.26 U21.14 Y1.2 | length 111.6
  01_Top w0.203: 78,-9.2 U21.14@78.5,-9.2
  01_Top w0.254: U4.8@40.75,27.475 40.75,26.75 v2(41,26.5) ; U4.7@41.25,27.475 41.25,26.25 v2(41.5,26) ; U4.15@41.75,24.525 41.75,25.75 v2(41.5,26) ; U4.6@41.75,27.475 41.75,26.25 v2(41.5,26) ; C49.1@42,23.2 v2(42,25.5) 42.25,25.25 U4.16@42.25,24.525 ; U5.16@49.35,-24.725 49.35,-25.45 v2(49.6,-25.7) C68.1@49.6,-23.4 ; U5.6@49.85,-27.675 49.85,-26.45 v2(50.1,-26.2) ; U5.15@49.85,-24.725 49.85,-25.95 v2(50.1,-26.2) ; U5.7@50.35,-27.675 50.35,-26.45 v2(50.1,-26.2) ; v2(50.6,-26.7) 50.85,-26.95 U5.8@50.85,-27.675 ; U7.8@59.25,27.475 59.25,26.75 v2(59.5,26.5) ; U7.7@59.75,27.475 59.75,26.25 v2(60,26) ; U7.15@60.25,24.525 60.25,25.75 v2(60,26) ; U7.6@60.25,27.475 60.25,26.25 v2(60,26) ; C111.1@60.5,23.2 v2(60.5,25.5) 60.75,25.25 U7.16@60.75,24.525 ; U6.16@62.45,-24.725 62.45,-25.45 v2(62.7,-25.7) C88.1@62.7,-23.4 ; U6.6@62.95,-27.675 62.95,-26.45 v2(63.2,-26.2) ; U6.15@62.95,-24.725 62.95,-25.95 v2(63.2,-26.2) ; U6.7@63.45,-27.675 63.45,-26.45 v2(63.2,-26.2) ; v2(63.7,-26.7) 63.95,-26.95 U6.8@63.95,-27.675 ; v1(77.2,-10) 78,-9.2
  01_Top w0.508: v1(125.1,0.5) 125.87,1.27 P1.2@132,1.27
  04_Bottom w0.152: C116.1@49.5,-5.5 C64.1@49.5,-6.5 v1(50.5,-6.5) C50.1@51.5,-7.5 ; v1(49.5,5.5) C43.1@50.5,5.5 C118.1@50.5,6.5 ; C117.1@49.5,8.5 v1(48.5,8.5) C61.1@49.5,9.5 ; C112.1@52.5,7.5 v1(53.5,7.5) C103.1@53.5,6.5 ; v1(52.5,9.5) C101.1@53.5,9.5 ; v1(53.5,1.5) C39.1@54.5,2.5 ; C79.1@54.5,-5.5 C73.1@54.5,-6.5 v1(55.5,-6.5) C27.1@56.5,-6.5 ; C95.1@54.5,4.5 v1(55.5,3.5) ; C98.1@55.5,7.5 v1(56.5,6.5) C105.1@57.5,6.5 ; C69.1@56.5,-9.5 v1(57.5,-10.5) C70.1@58.5,-9.5 C82.1@58.5,-8.5 ; C71.1@56.5,-5.5 C27.1@56.5,-6.5 ; v1(56.5,-3.5) C25.1@57.5,-2.5 ; C74.1@57.5,-6.5 C27.1@56.5,-6.5 ; C102.1@57.5,5.5 C105.1@57.5,6.5 ; v1(58.5,-1.5) C37.1@59.5,-0.5 ; v1(58.5,0.5) C24.1@59.5,1.5 ; C94.1@58.5,6.5 C105.1@57.5,6.5 ; v1(59.5,-4.5) C91.1@60.5,-3.5 ; v1(59.5,5.5) C108.1@59.5,6.5 ; C119.1@59.5,9.5 v1(60.5,8.5) C31.1@61.5,8.5 C104.1@62.5,8.5 ; v1(60.5,-6.5) C21.1@61.5,-6.5 C78.1@62.5,-6.5 C77.1@62.5,-7.5 ; v1(60.5,-1.5) C92.1@61.5,-0.5 ; C99.1@60.5,4.5 v1(60.5,5.5) C63.1@61.5,5.5 ; v1(62.5,-10.5) C75.1@63.5,-9.5 ; C84.1@62.5,-2.5 C46.1@63.5,-3.5 v1(64.5,-4.5) ; C90.1@62.5,1.5 v1(63.5,2.5) ; v1(62.5,4.5) C114.1@63.5,5.5 ; C86.1@63.5,-0.5 v1(64.5,0.5) ; v1(63.5,7.5) C109.1@64.5,8.5
  04_Bottom w0.254: v1(35.3,-24.137) 35.3,-24.6 C113.1@36.3,-25.6 ; v1(47.5,-5.5) 47.6,-5.4 C8.1@47.6,-4.5 ; v1(49.5,-9.5) C106.1@51.5,-9.5 ; C66.1@52.5,-7.5 v1(52.5,-5.5) ; C89.1@64.5,-1.5 v1(65.5,-1.5)
  04_Bottom w0.508: v1(25.1,-17.3) D16.1@25.1,-15.7 D17.1@25.1,-14.1 D18.1@25.1,-12.5
  other v1: 34,-26.662 39.6,-26.662 54,-26.5 67.1,-26.5 54.4,-25.3 67.5,-25.3 54,-24.1 67.1,-24.1 80.8,-23 95.8,-23 100.8,-23 105.8,-23 110.8,-23 54,-22.1 67.1,-22.1 43.2,-21.8 51.7,-21.8 56.3,-21.8 64.8,-21.8 20.925,-18.7 59.06,-14.57 48.4,-13.9 49.4,-13.9 55.2,-13.9 65.1,-13.9 66.1,-13.9 34.9,-13.6 74,-13.6 75.5,-13.5 76.9,-13.5 53.6,-13 52.8,-12.9 60.7,-12.9 61.7,-12.9 26.5,-11.4 20.925,-11.1 41,-10.9 44.5,-10.5 45.5,-10.5 52.5,-10.5 41,-9.9 46.5,-9.5 47.5,-9.5 54.5,-9.5 44.5,-8.5 45.5,-8.5 48.5,-8.5 61.5,-8.5 46.5,-7.5 47.5,-7.5 41,-6.5 44.5,-6.5 45.5,-6.5 47.5,-6.5 65.5,-6.5 41,-5.5 46.5,-5.5 48.5,-5.5 44.5,-4.5 45.5,-4.5 51.5,-4.5 46.5,-3.5 25.7,-3.2 26.5,-3.2 44.5,-2.5 45.5,-2.5 47.5,-2.5 53.5,-2.5 23.8,-1.9 40.7,-1.7 46.5,-1.5 48.5,-1.5 50.5,-1.5 54.5,-1.5 56.5,-1.5 73.8,-0.7 75.2,-0.7 44.5,-0.5 45.5,-0.5 47.5,-0.5 53.5,-0.5 55.5,-0.5 57.5,-0.5 40.7,-0.3 74.5,0 46.5,0.5 48.5,0.5 49.5,0.5 54.5,0.5 56.5,0.5 73.8,0.7 75.2,0.7 23.8,1.1 40.7,1.1 127.2,1.4 44.5,1.5 45.5,1.5 47.5,1.5 51.5,1.5 55.5,1.5 57.5,1.5 40.7,2.5 46.5,2.5 48.5,2.5 58.5,2.5 25.7,3.2 26.5,3.2 44.5,3.5 45.5,3.5 46.5,3.5 47.5,3.5 50.5,3.5 65.5,3.5 40.7,3.9 30.4,4.445 46.5,4.5 47.5,4.5 52.5,4.5 40.7,5.3 44.5,5.5 45.5,5.5 48.5,5.5 36.1,5.8 30.4,6.1 32.2,6.1 40.9,6.5 46.5,6.5 47.5,6.5 48.5,6.5 44.5,7.5 45.5,7.5 48.5,7.5 46.5,8.5 47.5,8.5 44.5,9.5 45.5,9.5 57.5,9.5 35.8,10.1 45.5,10.5 54.5,10.5 64.5,10.5 35.8,14.7 85.75,15.025 35.8,19.2 86.5,19.3 90.3,19.3 39.9,21.6 48.4,21.6 58.4,21.6 66.9,21.6 71.4,21.6 37.6,21.9 56.1,21.9 68.8,22 80.8,23 95.8,23 100.8,23 105.8,23 110.8,23 72.8,23.8 37.6,23.9 56.1,23.9 71.3,24.3 72.8,24.8 28.9,24.9 31.3,24.9 35.6,24.9 37.2,25.1 55.7,25.1 28.9,25.8 37.6,26.3 56.1,26.3 51.4,26.8 52.8,26.8 71.4,27 52.1,27.5 51.4,28.2 52.8,28.2
  other v2: 49.6,-26.7 62.7,-26.7 50.6,-25.7 63.7,-25.7 41,25.5 59.5,25.5 42,26.5 60.5,26.5
JTAG_TCK: D18.2 R27.2 R40.1 U2.V5 | length 26.4
  01_Top w0.152: R40.1@27.5,-11.4 v1(27.5,-12.4) 29,-12.4 30.2,-11.2 30.2,-9.9 31.7,-8.4 36.3,-8.4 37.1,-7.6 37.1,-6.3 v1(37.4,-6)
  04_Bottom w0.152: v1(37.4,-6) 48,-6 v1(48.5,-6.5)
JTAG_TDI: D16.2 R29.2 R41.1 U2.W5 | length 26.6
  01_Top w0.152: v1(27.5,-15.4) R41.1@27.5,-14.4 28.2,-14.4 31,-11.6 31,-10.3 32.1,-9.2 36.7,-9.2 37.9,-8 v1(37.9,-7)
  04_Bottom w0.152: v1(37.9,-7) 48,-7 v1(48.5,-7.5)
JTAG_TDO: D17.2 R28.2 U2.M5 | length 28.5
  01_Top w0.152: v1(27.5,-13.4) 28.6,-13.4 30.6,-11.4 30.6,-10.1 31.9,-8.8 36.5,-8.8 37.5,-7.8 37.5,-7.17 37.497,-7.167 37.497,-6.603 41.5,-2.6 42.5,-2.6 44.1,-1 48,-1 U2.M5@48.5,-0.5
  04_Bottom w0.152: D17.2@27.5,-14.1 v1(27.5,-13.4)
JTAG_TMS: D15.2 R30.2 R43.1 U2.P5 | length 30.6
  01_Top w0.152: v1(27.5,-17.4) R30.2@27.5,-16.4 27.9,-16.4 28.2,-16.1 28.2,-15 31.4,-11.8 31.4,-10.5 32.3,-9.6 36.9,-9.6 38.303,-8.197 38.303,-6.397 41.7,-3 42.7,-3 43.7,-2 48,-2 U2.P5@48.5,-2.5
LED_ACT: D6.2 U1.8 | length 2
  01_Top w0.152: U1.8@30.4,-4.445 31.2,-5.245 D6.2@31.2,-6.1
LED_CHIRP: R22.2 TP10.1 U2.B10 | length 24.1
  01_Top w0.152: TP10.1@36.8,17.8 36.8,14.1 37.3,13.6 50.3,13.6 53,10.9 53,10 U2.B10@53.5,9.5
  01_Top w0.254: R22.2@35.5,17.8 TP10.1@36.8,17.8
LED_RX_DIV1: R11.2 U2.W9 | length 50.2
  01_Top w0.152: U2.W9@52.5,-7.5 53,-8 53,-10.7 v1(53.5,-11.2)
  04_Bottom w0.152: v1(53.5,-11.2) 54.5,-12.2 57,-12.2 57.6,-12.8 57.6,-15.5 58.6,-16.5 68.9,-16.5 74.1,-21.7 91.8,-21.7 R11.2@93.1,-23
LED_RX_DIV2: R15.2 U2.U7 | length 58.9
  01_Top w0.152: U2.U7@50.5,-5.5 51,-6 53.7,-6 54,-6.3 54,-10.7 v1(54.5,-11.2)
  04_Bottom w0.152: v1(54.5,-11.2) 55.2,-11.9 57.1,-11.9 57.9,-12.7 57.9,-15.3 58.8,-16.2 69,-16.2 74.2,-21.4 96.5,-21.4 R15.2@98.1,-23
LED_RX_DIV4: R18.2 U2.U8 | length 63.9
  01_Top w0.152: U2.U8@51.5,-5.5 52,-5 54.7,-5 55,-5.3 55,-10.7 v1(55.5,-11.2)
  04_Bottom w0.152: v1(55.5,-11.2) 55.903,-11.603 56.667,-11.603 56.67,-11.6 57.2,-11.6 58.2,-12.6 58.2,-15.1 59,-15.9 69.1,-15.9 74.3,-21.1 101.2,-21.1 R18.2@103.1,-23
LED_RX_DIV8: R21.2 U2.T7 | length 70.9
  01_Top w0.152: U2.T7@50.5,-4.5 51,-4 55.7,-4 56,-4.3 56,-10.7 v1(56.5,-11.2)
  04_Bottom w0.152: v1(56.5,-11.2) 57.2,-11.2 58.5,-12.5 58.5,-15 59.1,-15.6 69.2,-15.6 74.4,-20.8 105.9,-20.8 R21.2@108.1,-23
LED_RX_FLT: R7.2 U2.W8 | length 36.2
  01_Top w0.152: U2.W8@51.5,-7.5 52,-8 52,-10.7 v1(52.5,-11.2)
  04_Bottom w0.152: v1(52.5,-11.2) 53.8,-12.5 56.8,-12.5 57.3,-13 57.3,-15.7 58.4,-16.8 68.8,-16.8 74,-22 77.1,-22 R7.2@78.1,-23
LED_STATE: R16.2 U2.C9 | length 20.4
  01_Top w0.152: R16.2@35.5,13.3 50.1,13.3 52,11.4 52,9 U2.C9@52.5,8.5
LED_TX_DIV1: R10.2 U2.A7 | length 48.9
  01_Top w0.152: U2.A7@50.5,10.5 v1(50.5,11.5)
  04_Bottom w0.152: v1(50.5,11.5) 50.5,12.5 57.2,19.2 76.2,19.2 78.9,21.9 92,21.9 R10.2@93.1,23
LED_TX_DIV2: R14.2 U2.A8 | length 53.2
  04_Bottom w0.152: v1(51.5,10.5) 51.5,13 57.4,18.9 76.3,18.9 79,21.6 96.7,21.6 R14.2@98.1,23
LED_TX_DIV4: R17.2 U2.A9 | length 57.5
  04_Bottom w0.152: v1(52.5,10.5) 52.5,13.5 57.6,18.6 76.4,18.6 79.1,21.3 101.4,21.3 R17.2@103.1,23
LED_TX_DIV8: R20.2 U2.A10 | length 61.8
  04_Bottom w0.152: v1(53.5,10.5) 53.5,14 57.8,18.3 76.5,18.3 79.2,21 106.1,21 R20.2@108.1,23
LED_TX_FLT: R6.2 U2.A5 | length 35.9
  01_Top w0.152: U2.A5@48.5,10.5 48.5,11 v1(49.4,11.9)
  04_Bottom w0.152: v1(49.4,11.9) 57,19.5 76.1,19.5 78.1,21.5 R6.2@78.1,23
MAINCLK: U2.W16 Y1.3 | length 5.7
  01_Top w0.152: Y1.3@59.06,-12.97 59,-12.909 59,-8 U2.W16@59.5,-7.5
NetC17_1: C17.1 U3.6
  other v1: 68.9,23.35
NetC17_2: C17.2 U3.5
  other v1: 68.9,24.3
NetC45_1: C45.1 U4.9 | length 1.6
  01_Top w0.254: C45.1@38.6,26.3 39,26.3 39.45,26.75 U4.9@40.025,26.75
NetC48_1: C48.1 C49.2 L1.2 R4.2 R5.2 U4.14 | length 10.1
  01_Top w0.254: U4.14@41.25,24.525 41.25,23.95 40.8,23.5 R5.2@40.8,23.2 40.8,22.1 C48.1@41.3,21.6
  01_Top w0.762: C48.1@41.3,21.6 R4.2@42.6,21.6 43,22 C49.2@43,23.2 43.815,24.015 L1.2@46.4,24.015
NetC65_1: C65.1 U5.9 | length 1.6
  01_Top w0.254: U5.9@51.575,-26.95 52.15,-26.95 52.6,-26.5 C65.1@53,-26.5
NetC67_1: C67.1 C68.2 L2.2 R23.2 R24.2 U5.14 | length 10.1
  01_Top w0.254: C67.1@50.3,-21.8 50.8,-22.3 R24.2@50.8,-23.4 50.8,-23.7 50.35,-24.15 U5.14@50.35,-24.725
  01_Top w0.762: L2.2@45.2,-24.215 47.785,-24.215 C68.2@48.6,-23.4 48.6,-22.2 R23.2@49,-21.8 C67.1@50.3,-21.8
NetC85_1: C85.1 U6.9 | length 1.6
  01_Top w0.254: U6.9@64.675,-26.95 65.25,-26.95 65.7,-26.5 C85.1@66.1,-26.5
NetC87_1: C87.1 C88.2 L3.2 R32.2 R33.2 U6.14 | length 10.1
  01_Top w0.254: C87.1@63.4,-21.8 63.9,-22.3 63.9,-23.7 63.45,-24.15 U6.14@63.45,-24.725
  01_Top w0.762: L3.2@58.3,-24.215 60.885,-24.215 C88.2@61.7,-23.4 61.7,-22.2 R32.2@62.1,-21.8 C87.1@63.4,-21.8
NetC107_1: C107.1 U7.9 | length 1.6
  01_Top w0.254: C107.1@57.1,26.3 57.5,26.3 57.95,26.75 U7.9@58.525,26.75
NetC110_1: C110.1 C111.2 L4.2 R44.2 R45.2 U7.14 | length 10.1
  01_Top w0.254: U7.14@59.75,24.525 59.75,23.95 59.3,23.5 R45.2@59.3,23.2 59.3,22.1 C110.1@59.8,21.6
  01_Top w0.762: C110.1@59.8,21.6 R44.2@61.1,21.6 61.5,22 C111.2@61.5,23.2 62.315,24.015 L4.2@64.9,24.015
NetC145_1: C145.1 C151.2 R60.2 U11.5 | length 4.4
  01_Top w0.254: U11.5@97.85,15.3 99.2,15.3 R60.2@99.4,15.1 C151.2@99.4,16.5 C145.1@99.4,17.9
NetC146_1: C146.1 C147.2 R57.1 U10.13 | length 8.4
  01_Top w0.254: C146.1@107.3,12.9 107.3,13.6 ; R57.1@107.3,15.7 C147.2@107.3,14.3 107.3,13.6 ; U10.13@111.775,14.975 111.775,13.975 111.4,13.6 107.3,13.6
NetC148_2: C148.2 U9.19 | length 3.5
  01_Top w0.254: U9.19@85.75,10.475 87.425,10.475 88.2,9.7 C148.2@88.9,9.7
NetC149_1: C149.1 C153.2 R62.2 U12.5 | length 4.4
  01_Top w0.254: U12.5@97.85,6.7 99.2,6.7 C153.2@99.4,6.5 ; R62.2@99.4,5.1 C153.2@99.4,6.5 ; C149.1@99.4,7.9 C153.2@99.4,6.5
NetC150_1: C150.1 C156.2 R63.2 U13.5 | length 6.5
  01_Top w0.254: R63.2@118.3,5.1 C150.1@118.3,6.5 C156.2@118.3,7.9 117.65,8.55 117.65,10.1 U13.5@118.55,11
NetC152_2: C152.2 U9.23 | length 3.8
  01_Top w0.254: U9.23@85.75,13.075 86.975,13.075 88.5,14.6 C152.2@88.9,14.6
NetC154_2: C154.2 C155.1 R66.1 U10.3 | length 7.8
  01_Top w0.254: R66.1@107.3,8.7 C155.1@107.3,10.1 107.3,10.8 ; C154.2@107.3,11.5 107.3,10.8 ; U10.3@111.125,9.425 111.125,10.375 110.7,10.8 107.3,10.8
NetC157_1: C157.1 R72.1 TP27.1 U11.3 | length 11.7
  01_Top w0.254: U11.3@95.95,17.7 95.95,18.45 R72.1@96.8,19.3 C157.1@99.4,19.3 100.1,18.6 100.1,14.7 99.7,14.3 98.9,14.3 98.6,14 TP27.1@98.6,13.5
NetC159_2: C159.2 C162.1 R90.2 U11.2 | length 6.1
  01_Top w0.254: C162.1@94.4,19.3 C159.2@94.4,17.9 R90.2@94.4,16.5 94.7,16.8 96.6,16.8 96.9,17.1 U11.2@96.9,17.7
NetC160_2: C160.2 C164.1 R93.2 U12.2 | length 4.7
  01_Top w0.254: U12.2@96.9,9.1 96.9,9.4 98,10.5 R93.2@98.2,10.5 99.2,10.5 C164.1@99.4,10.7 C160.2@99.4,9.3
NetC161_2: C161.2 C165.1 R94.2 U13.2 | length 4.8
  01_Top w0.254: U13.2@117.6,13.4 117.6,14.4 C161.2@118.3,15.1 C165.1@118.3,16.5 R94.2@118.3,17.9
NetC163_1: C163.1 U9.17 | length 4.4
  01_Top w0.254: U9.17@85.75,9.175 86.725,9.175 88.1,7.8 88.1,7.2 88.4,6.9 C163.1@88.9,6.9
NetC166_1: C166.1 R112.1 U16.4 | length 6.2
  01_Top w0.254: R112.1@112.8,-13.5 113.75,-14.45 v1(113.75,-15.1)
  04_Bottom w0.254: v1(113.75,-15.1) 113.75,-18.65 v1(114.2,-19.1)
NetC166_2: C166.2 R101.1 R116.2 U16.1 | length 18.5
  01_Top w0.254: R101.1@110.4,-19.1 110.9,-19.1 111.85,-18.15 C166.2@112.8,-19.1
  04_Bottom w0.254: v1(111.8,-17.5) 111.8,-7.7 113.5,-6 v1(116.6,-6)
NetC167_1: C167.1 R117.1 U18.4 | length 6.2
  01_Top w0.254: R117.1@112.8,-6 113.75,-6.95 U18.4@113.75,-7.6
  04_Bottom w0.254: v1(113.7,-7.6) 114.2,-8.1 v1(114.2,-11.6)
NetC168_1: C168.1 C173.2 R106.2 U15.5 | length 8.7
  01_Top w0.254: U15.5@118.15,-11.4 117.9,-11.15 117.9,-9.3 118.2,-9 119.6,-9 C168.1@120.3,-8.3 ; C173.2@119.1,-7.1 C168.1@120.3,-8.3 ; R106.2@121.7,-9.7 C168.1@120.3,-8.3
NetC169_1: C169.1 C170.2 R104.1 U14.13 | length 7.4
  01_Top w0.254: C169.1@98.2,-11.8 98.2,-11.1 ; R104.1@98.2,-9 C170.2@98.2,-10.4 98.2,-11.1 ; U14.13@101.675,-9.725 101.675,-10.625 101.2,-11.1 98.2,-11.1
NetC171_1: C171.1 C175.2 R108.2 U17.5 | length 4.3
  01_Top w0.254: R108.2@89,-17.9 C171.1@89,-16.5 C175.2@89,-15.1 89.2,-15.3 U17.5@90.45,-15.3
NetC172_1: C172.1 C176.2 R107.2 U16.5 | length 4.3
  01_Top w0.254: R107.2@110.4,-17.7 C172.1@110.4,-16.3 C176.2@110.4,-14.9 111.65,-14.9 U16.5@111.85,-15.1
NetC174_1: C174.1 C179.2 R109.2 U18.5 | length 4.3
  01_Top w0.254: R109.2@110.4,-10.2 C179.2@110.4,-8.8 C174.1@110.4,-7.4 111.65,-7.4 U18.5@111.85,-7.6